# Altium PCB IoT-Button-PCB.PcbDoc (part 2 of 2)
Units mm, origin at the board's own origin, x right, y up, seen from the top; angles counter-clockwise.
Board outline 90 x 83 mm, 2 copper layers (Top Layer, Bottom Layer), stack 1.17 mm thick; 63 components, 30 nets, 232 pads, 64 vias.
Unrouted connection lines stored in the file: 71.
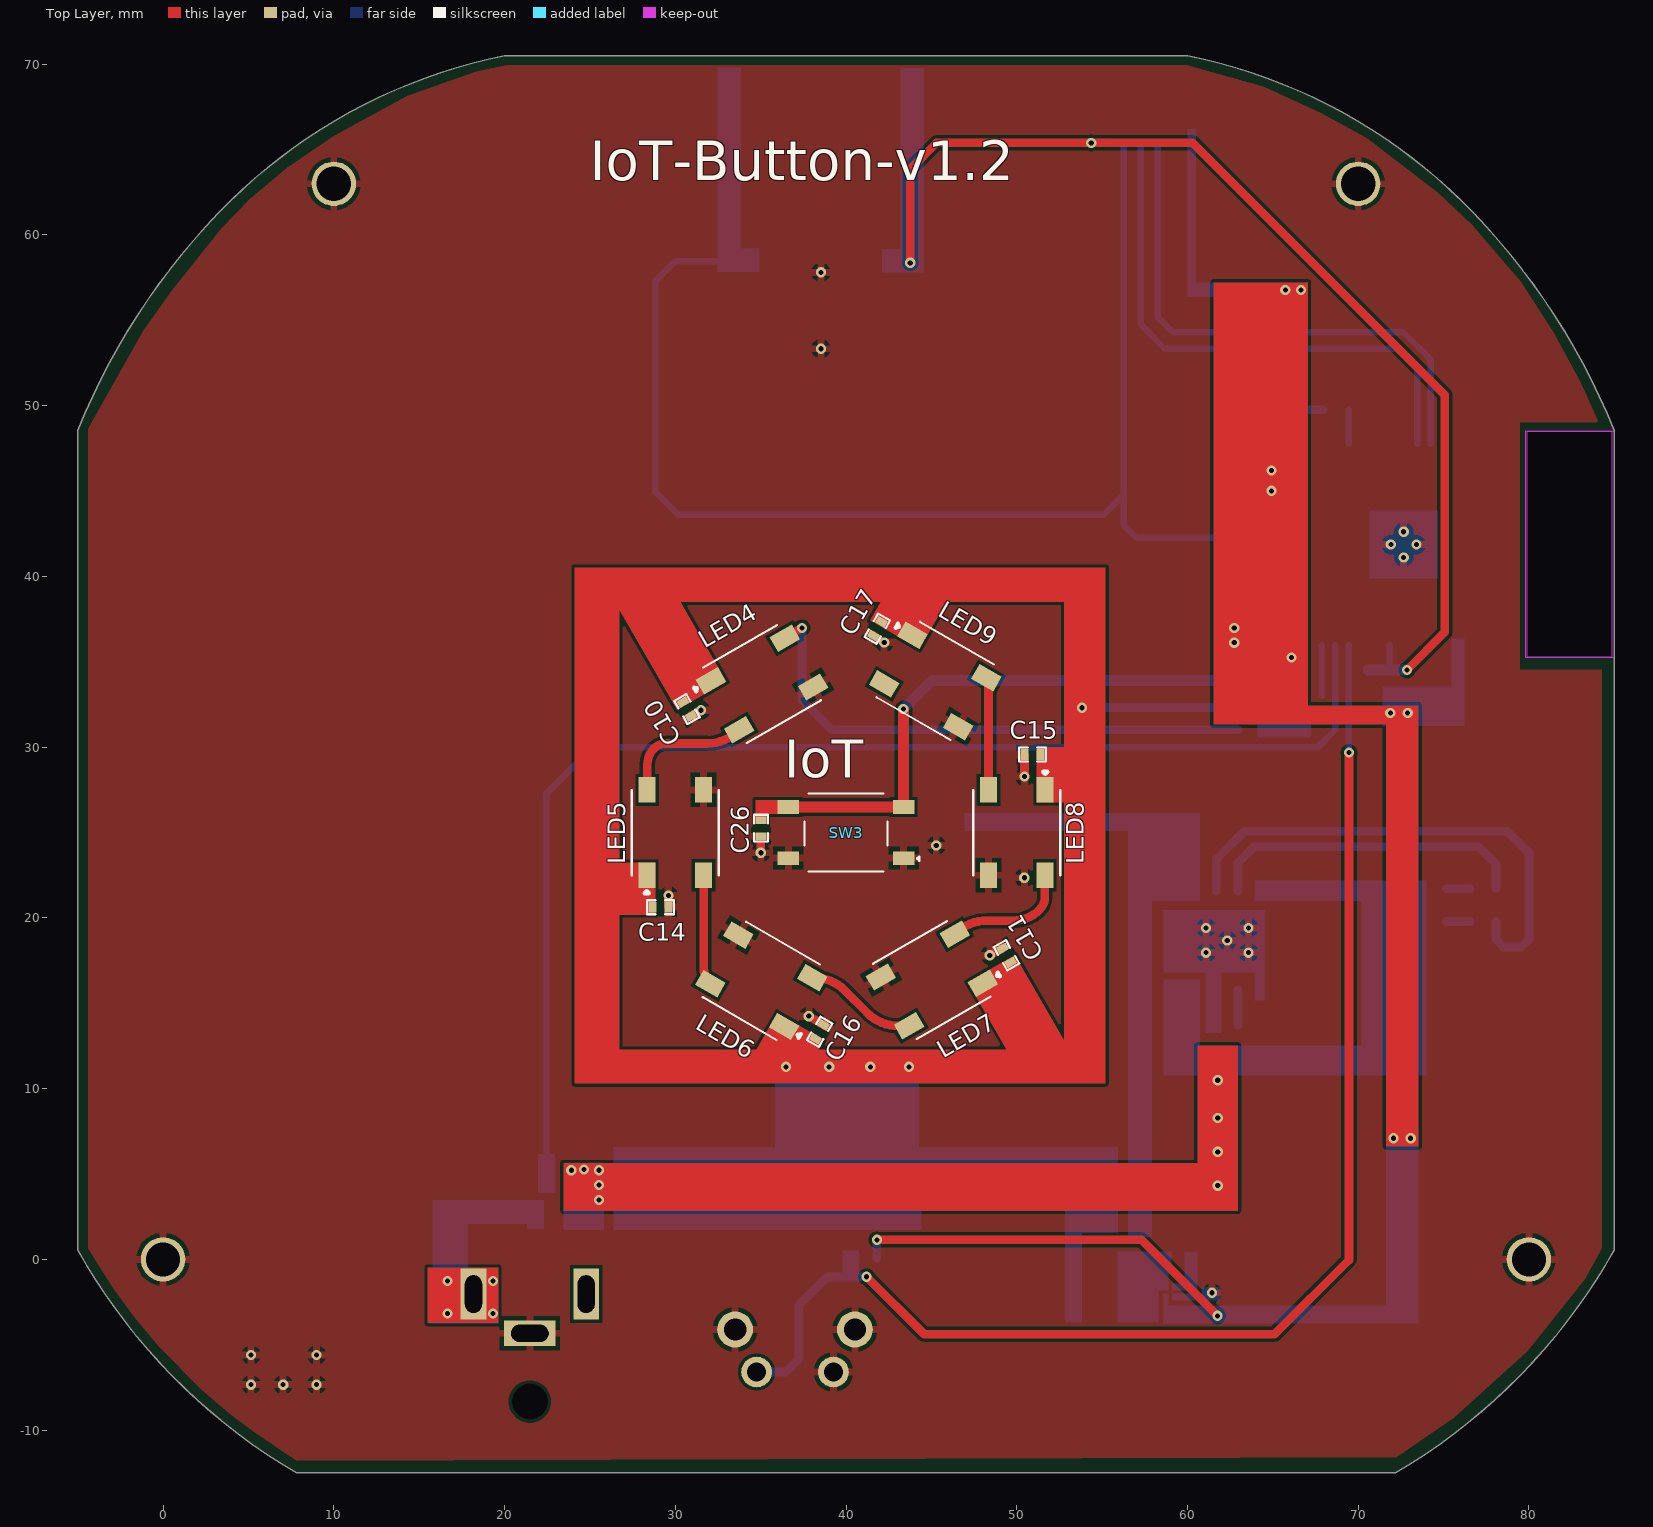
[diagram p0: Top Layer view]

## Polygon pours and split planes (outlines as drawn)
GND on Top Layer "NONET_L02_P-001" (solid, remove dead copper, pour order 1): -4.37,48.658 -4.37,0.658 -3.678,-0.487 -2.896,-1.718 -1.711,-3.338 -0.221,-5.119 2.263,-7.632 3.895,-9.051 5.282,-10.064 6.493,-10.902 7.827,-11.788 72.219,-11.588 75.602,-9.281 79.902,-5.372 83.26,-1.174 84.276,0.658 84.276,34.525 79.475,34.525 79.475,49.022 84.089,49.022 83.006,51.404 81.42,54.311 79.511,57.258 76.642,60.61 74.638,62.497 70.466,65.699 67.766,67.152 64.464,68.676 59.983,69.946 20.086,69.946 18.412,69.581 14.335,68.152 10.013,65.82 7.282,63.924 5.072,62.084 3.428,60.394 0.55,56.761 -1.131,54.425
GND on Bottom Layer "NONET_L02_P-001" (solid, remove dead copper, pour order 0): -4.37,48.658 -4.37,0.658 -3.678,-0.487 -2.896,-1.718 -1.711,-3.338 -0.221,-5.119 2.263,-7.632 3.895,-9.051 5.282,-10.064 6.493,-10.902 7.827,-11.788 72.17,-11.588 75.894,-9.048 79.806,-5.492 83.26,-1.174 84.276,0.658 84.276,34.525 79.704,34.525 79.704,49.022 84.089,49.022 83.006,51.404 82.181,52.917 78.922,57.946 76.642,60.61 74.638,62.497 70.466,65.699 67.766,67.152 64.464,68.676 59.983,69.946 20.147,69.946 18.148,69.51 14.557,68.251 9.883,65.729 7.282,63.924 5.072,62.084 3.428,60.394 0.55,56.761 -1.131,54.425

## Other copper
Top Layer:
  region net 5VCC: 53.161,12.179 49.894,17.837 47.123,16.238 50.39,10.58
  region net 5VCC: 30.108,32.163 33.01,33.839 29.184,40.465 26.282,38.79
  region net 5VCC: 41.401,37.419 44.303,35.744 45.898,38.506 42.996,40.182
  rectangle net 5VIN: 15.494,-3.734 19.634,-0.483
  rectangle net 3.3V: 64.07,44.507 67.054,46.813
  rectangle net 3.3V: 61.519,31.319 67.054,57.215
  rectangle net 3.3V: 65.328,31.319 73.532,32.453
  rectangle net 3.3V: 71.634,6.604 73.532,32.453
  rectangle net IOT_BUT: 34.708,26.1 37.25,26.9
  rectangle net IOT_BUT: 34.708,25.495 35.343,26.9
  rectangle net 5VDC: 60.579,3.251 62.967,12.522
  rectangle net 5VDC: 23.448,2.845 62.967,5.635
  rectangle net 5VCC: 24.155,20.18 28.85,23.25
  region net 5VCC: 55.194,12.294 24.155,12.294 24.155,10.306 55.194,10.306
  rectangle net 5VCC: 24.106,10.312 26.746,40.513
  rectangle net 5VCC: 24.155,38.506 55.21,40.513
  rectangle net 5VCC: 52.759,10.369 55.21,40.513
  region net 5VCC: 55.21,30.01 51.15,30.01 51.15,26.75 55.21,26.75
  region net 5VCC: 37.354,10.533 38.705,12.873 35.982,14.445 34.631,12.105
Bottom Layer:
  rectangle net NetQ1_3: 64.11,30.813 64.948,33.026
  rectangle net NetQ1_3: 64.11,30.566 67.229,31.458
  rectangle net 3.3V: 65.459,32.566 66.631,35.689
  rectangle net BUTTON: 39.802,-1.295 40.767,0.521
  region net IO0: 34.922,59.197 32.618,59.197 32.618,57.818 34.922,57.818
  region net IO0: 32.484,69.797 32.484,57.818 33.863,57.818 33.863,69.797
  region net EN: 43.18,69.79 43.18,57.81 44.559,57.81 44.559,69.79
  rectangle net 3.3V: 75.477,31.242 76.236,36.367
  rectangle net GND: 70.662,39.867 74.662,43.867
  rectangle net 5VIN: 15.579,-3.785 19.634,-0.476
  rectangle net GND: 58.607,16.805 64.535,20.462
  rectangle net 5VDC: 70.204,10.776 74.014,22.179
  rectangle net 5VDC: 58.607,10.776 74.016,12.529
  rectangle net GND: 60.852,-2.42 61.949,-1.627
  rectangle net GND: 59.083,-2.42 61.949,-1.999
  rectangle net GND: 61.06,13.27 61.995,17.47
  rectangle net BATT: 46.937,25.098 60.725,26.143
  rectangle net 3.3V: 60.008,56.378 67.055,57.215
  rectangle net 3.3V: 60.008,56.378 60.508,66.194
  rectangle net BATT: 56.641,20.979 60.725,26.143
  region net 3.3V: 62.053,37.415 62.053,35.689 64.141,35.689 64.141,37.415
  rectangle net 3.3V: 71.634,-3.766 73.532,7.728
  rectangle net 3.3V: 71.431,31.242 76.112,33.542
  rectangle net BATT: 56.515,1.302 57.936,26.143
  rectangle net EN: 42.121,57.81 44.425,59.19
  rectangle net 3.3V: 64.07,49.067 65.293,49.956
  rectangle net 3.3V: 64.07,43.41 65.293,50.21
  rectangle net GND: 63.935,15.162 64.535,19.87
  rectangle net GND: 61.395,15.162 61.995,19.87
  rectangle net BATT: 56.641,20.979 60.725,22.283
  rectangle net 5VDC: 60.579,3.251 62.967,12.522
  rectangle net 5VDC: 58.607,10.776 60.725,16.399
  rectangle net 5VDC: 63.935,20.979 74.014,22.179
  rectangle net 5VCC: 35.838,5.137 44.271,12.243
  rectangle net NetR6_1: 59.083,-1.814 60.588,-1.416
  rectangle net NetR6_1: 59.826,-1.814 60.588,0.441
  rectangle net VIN: 55.917,-3.702 58.302,0.457
  rectangle net 3.3V: 58.57,-3.701 58.898,-1.999
  rectangle net 3.3V: 58.57,-3.766 73.532,-2.692
  rectangle net VIN: 55.981,-2.077 58.302,0.457
  rectangle net VIN: 55.917,-0.463 59.064,0.457
  rectangle net VIN: 56.058,-1.814 58.898,0.457
  rectangle net 5VCC: 32.13,4.293 55.938,6.585
  rectangle net 5VCC: 26.384,1.718 44.419,6.585
  rectangle net 5VCC: 52.831,1.537 55.928,6.585
  rectangle net 5VCC: 52.831,-3.702 53.823,4.106
  region net JACK_DET: 22.962,3.873 22.962,6.176 21.946,6.176 21.946,3.873
  rectangle net 5VDC: 23.448,1.718 25.832,5.664
  rectangle net 5VIN: 15.782,2.064 22.314,3.483
  rectangle net 5VIN: 21.314,1.783 22.314,3.483
  rectangle net 5VIN: 15.782,-3.213 17.857,3.483
  rectangle net 5VIN: 15.782,-3.213 18.782,-1.213

## Silkscreen, mask and mechanical layers (free items; w line width, h text height)
Top Overlay:
  text "IoT-Button-v1.2" at 25,62.456 h4
  text "IoT" at 36.388,27.484 h3.81
Bottom Overlay:
  drawing of 3082 lines, arcs and shapes, not listed
  text "SERIAL PROGRAMMING" at 67.704,60.082 h2.54
  text "GPIO" at 75.422,48.855 h2.03
  text "ZERO CARBON FOOTPRINT" at 26.427,46.666 h0.97
  text "RESET" at 39.819,44.704 h3.81 r270
  text "BOOT" at 32.999,44.691 h3.81 r270
  text "CHARGING" at 83.757,22.845 h2.54
  text "FULLY CHARGED" at 83.757,14.656 h2.54
  text "Place Battery here" at 39.677,13.514 h5.71
  text "POWER" at 25.795,-12.427 h3.81 r270
  text "INPUT" at 42.71,-12.427 h3.81 r270
Deimensions:
  circle w0.254: c40,25 r10
  lines w0.254: 35.5,-12.5 38.5,-12.5 ; 35.5,-12.424 35.5,-10.424 38.5,-10.424 38.5,-12.424 ; 18.363,-10.516 24.363,-10.516 24.363,-6.444 18.363,-6.444 18.363,-10.516 ; 19.613,-12.416 23.113,-12.416 23.113,-10.516 19.613,-10.516 19.613,-12.416 ; 33.8,-10.424 33.8,-7.324 39.8,-7.324 39.8,-10.424 33.8,-10.424 ; 37,22 37,28 43,28 43,22 37,22 ; 38.5,25 cw(c40,25) 41.5,25 cw(c40,25) 38.5,25
Board Outline:
  lines w0.254: 35.5,-12.5 38.5,-12.5 ; -5,0.544 ccw(c25.512,17.69) 7.805,-12.5 72.195,-12.5 ccw(c54.488,17.69) 85,0.544 85,35.235 79.812,35.224 79.812,48.535 85,48.544 ccw(c47.9,33.591) 76.75,61.298 ccw(c53.67,39.132) 60,70.5 20,70.5 ccw(c26.33,39.132) 3.25,61.298 ccw(c32.1,33.591) -5,48.544 -5,0.544 ; -1,0 cw(c0,0) 1,0 cw(c0,0) -1,0 ; 9,63 ccw(c10,63) 11,63 ccw(c10,63) 9,63 ; 69,63 ccw(c70,63) 71,63 ccw(c70,63) 69,63 ; 79,0 cw(c80,0) 81,0 cw(c80,0) 79,0
Fabrication:
  drawing of 386 lines, arcs and shapes, not listed
  text "Layer" at 118.809,112.606 h1.52
  text "Name" at 129.22,112.606 h1.52
  text "Material" at 152.836,112.606 h1.52
  text "Thickness" at 174.674,112.606 h1.52
  text "Constant" at 191.18,112.606 h1.52
  text "Board Layer Stack" at 205.654,112.606 h1.52
  text "Top Overlay" at 129.22,109.558 h1.52
  text "Top Solder" at 129.22,106.51 h1.52
  text "Solder Resist" at 152.836,106.51 h1.52
  text "0.39mil" at 174.674,106.51 h1.52
  text "3.5" at 191.18,106.51 h1.52
  text "1" at 118.809,103.462 h1.52
  text "Top Layer" at 129.22,103.462 h1.52
  text "1.38mil" at 174.674,103.462 h1.52
  text "Dielectric 1" at 129.22,100.414 h1.52
  text "FR-4" at 152.836,100.414 h1.52
  text "43.31mil" at 174.674,100.414 h1.52
  text "4.8" at 191.18,100.414 h1.52
  text "2" at 118.809,97.366 h1.52
  text "Bottom Layer" at 129.22,97.366 h1.52
  text "1.38mil" at 174.674,97.366 h1.52
  text "Bottom Solder" at 129.22,94.318 h1.52
  text "Solder Resist" at 152.836,94.318 h1.52
  text "0.39mil" at 174.674,94.318 h1.52
  text "3.5" at 191.18,94.318 h1.52
  text "Bottom Overlay" at 129.22,91.27 h1.52
Drill Drawing:
  circle w0.254: c-2.571,139.834 r0.847
  lines w0.254: -3.418,127.557 -2.571,127.981 -1.724,127.557 -2.148,128.404 -1.724,129.251 -2.571,128.827 -3.418,129.251 -2.994,128.404 -3.418,127.557 ; -3.418,131.791 -2.994,131.791 -2.571,131.367 -2.148,131.791 -1.724,131.791 -2.148,132.214 -1.724,132.637 -2.148,132.637 -2.571,133.061 -2.994,132.637 -3.418,132.637 -2.994,132.214 -3.418,131.791 ; -3.418,135.601 -2.994,135.601 -2.994,135.177 -2.148,135.177 -2.148,135.601 -1.724,135.601 -1.724,136.447 -2.148,136.447 -2.148,136.871 -2.994,136.871 -2.994,136.447 -3.418,136.447 -3.418,135.601 ; -3.418,144.491 -1.724,144.491 -2.571,142.797 -3.418,144.491 ; -3.418,146.607 -3.418,147.031 -2.994,147.454 -3.418,147.877 -3.418,148.301 -2.994,148.301 -2.571,147.877 -2.148,148.301 -1.724,148.301 -1.724,147.877 -2.148,147.454 -1.724,147.031 -1.724,146.607 -2.148,146.607 -2.571,147.031 -2.994,146.607 -3.418,146.607
  lines w0.381: -4.936,126.414 327.507,126.414 ; -4.936,149.274 327.507,149.274 ; 9.056,122.604 9.056,153.084 ; 22.768,122.604 22.768,153.084 ; 50.7,122.604 50.7,153.084 ; 63.549,122.604 63.549,153.084 ; 82.188,122.604 82.188,153.084 ; 120.277,122.604 120.277,153.084 ; 135.259,122.604 135.259,153.084 ; 154.202,122.604 154.202,153.084 ; 174.77,122.604 174.77,153.084 ; 196.456,122.604 196.456,153.084 ; 230.329,122.604 230.329,153.084 ; 264.203,122.604 264.203,153.084 ; 291.881,122.604 291.881,153.084 ; -4.936,122.604 327.507,122.604 327.507,153.084 -4.936,153.084 -4.936,122.604
  text "Symbol" at -2.65,150.417 h1.83
  text "Count" at 10.199,150.417 h1.83
  text "Hole Size" at 23.911,150.417 h1.83
  text "Plated" at 51.843,150.417 h1.83
  text "Hole Type" at 64.692,150.417 h1.83
  text "Drill Layer Pair" at 83.331,150.417 h1.83
  text "Via/Pad" at 121.42,150.417 h1.83
  text "Pad Shape" at 136.402,150.417 h1.83
  text "Template" at 155.345,150.417 h1.83
  text "Description" at 175.913,150.417 h1.83
  text "Hole Tolerance (+)" at 197.599,150.417 h1.83
  text "Hole Tolerance (-)" at 231.472,150.417 h1.83
  text "Hole Length" at 265.346,150.417 h1.83
  text "Routed Path Length" at 293.024,150.417 h1.83
  text "1" at 10.199,146.607 h1.52
  text "82.68mil (2.100mm)" at 23.911,146.607 h1.52
  text "NPTH" at 51.843,146.607 h1.52
  text "Round" at 64.692,146.607 h1.52
  text "Top Layer - Bottom Layer" at 83.331,146.607 h1.52
  text "Pad" at 121.42,146.607 h1.52
  text "Rounded" at 136.402,146.607 h1.52
  text "c0hn210m5" at 155.345,146.607 h1.52
  text "-" at 265.346,146.607 h1.52
  text "-" at 293.024,146.607 h1.52
  text "2" at 10.199,142.797 h1.52
  text "43.31mil (1.100mm)" at 23.911,142.797 h1.52
  text "PTH" at 51.843,142.797 h1.52
  text "Round" at 64.692,142.797 h1.52
  text "Top Layer - Bottom Layer" at 83.331,142.797 h1.52
  text "Pad" at 121.42,142.797 h1.52
  text "Rounded" at 136.402,142.797 h1.52
  text "c180h110" at 155.345,142.797 h1.52
  text "-" at 265.346,142.797 h1.52
  text "-" at 293.024,142.797 h1.52
  text "2" at 10.199,138.987 h1.52
  text "51.18mil (1.300mm)" at 23.911,138.987 h1.52
  text "PTH" at 51.843,138.987 h1.52
  text "Round" at 64.692,138.987 h1.52
  text "Top Layer - Bottom Layer" at 83.331,138.987 h1.52
  text "Pad" at 121.42,138.987 h1.52
  text "Rounded" at 136.402,138.987 h1.52
  text "c210h130" at 155.345,138.987 h1.52
  text "-" at 265.346,138.987 h1.52
  text "-" at 293.024,138.987 h1.52
  text "3" at 10.199,135.177 h1.52
  text "39.37mil (1.000mm)" at 23.911,135.177 h1.52
  text "PTH" at 51.843,135.177 h1.52
  text "Slot" at 64.692,135.177 h1.52
  text "Top Layer - Bottom Layer" at 83.331,135.177 h1.52
  text "Pad" at 121.42,135.177 h1.52
  text "Rectangle" at 136.402,135.177 h1.52
  text "(Mixed)" at 155.345,135.177 h1.52
  text "86.61mil (2.200mm)" at 265.346,135.177 h1.52
  text "47.24mil (1.200mm)" at 293.024,135.177 h1.52
  text "4" at 10.199,131.367 h1.52
  text "78.74mil (2.000mm)" at 23.911,131.367 h1.52
  text "PTH" at 51.843,131.367 h1.52
  text "Round" at 64.692,131.367 h1.52
  text "Top Layer - Bottom Layer" at 83.331,131.367 h1.52
  text "Pad" at 121.42,131.367 h1.52
  text "Rounded" at 136.402,131.367 h1.52
  text "c260h200m265" at 155.345,131.367 h1.52
  text "-" at 265.346,131.367 h1.52
  text "-" at 293.024,131.367 h1.52
  text "64" at 10.199,127.557 h1.52
  text "11.81mil (0.300mm)" at 23.911,127.557 h1.52
  text "PTH" at 51.843,127.557 h1.52
  text "Round" at 64.692,127.557 h1.52
  text "Top Layer - Bottom Layer" at 83.331,127.557 h1.52
  text "Via" at 121.42,127.557 h1.52
  text "Rounded" at 136.402,127.557 h1.52
  text "v60h30" at 155.345,127.557 h1.52
  text "-" at 265.346,127.557 h1.52
  text "-" at 293.024,127.557 h1.52
  text "76 Total" at 10.199,123.747 h1.52
  text "Slot definitions :" at -2.65,120.065 h1.52
  text "Routed Path Length" at 23.58,120.065 h1.52
  text "= Calculated from tool start centre position to tool end centre position." at 51.588,120.065 h1.52
  text "Hole Length" at 23.58,117.526 h1.52
  text "= Routed Path Length + Tool Size = Slot length as defined in the PCB layout" at 41.177,117.526 h1.52

## Dimensions
79.812,48.535 to 79.812,35.224 on Deimensions
79.812,48.535 to 85,48.544 on Deimensions
5.511,41.621 to 40.511,41.621 on Bottom Overlay
5.511,41.621 to 5.511,6.621 on Bottom Overlay
20,70.5 to 10,63 on Deimensions
20,70.5 to 10,63 on Deimensions
85,0.544 to 80,0 on Deimensions
80,0 to 85,0.544 on Deimensions
47.9,33.591 to 92.81,61.068 on Deimensions
53.67,39.132 to 72.744,76.435 on Deimensions
54.488,17.69 to 90.102,-17.924 on Deimensions
7.805,-12.5 to 72.195,-12.5 on Deimensions
20,70.5 to 60,70.5 on Deimensions
85,48.544 to 85,0.544 on Deimensions

## Text inside footprints (layer, text, board x,y; h text height)
SW1: Bottom Overlay "PCB Edge" at 39.147,-8.743 h1.02